# Altium PCB IOT_Speaker-PCB-v2.0.PcbDoc (part 3 of 3)
Units mil, origin at the board's own origin, x right, y up, seen from the top; angles counter-clockwise.
Board outline 2439.55 x 2668.91 mil, 2 copper layers (Top Layer, Bottom Layer), stack 61.811 mil thick; 126 components, 76 nets, 382 pads, 136 vias.
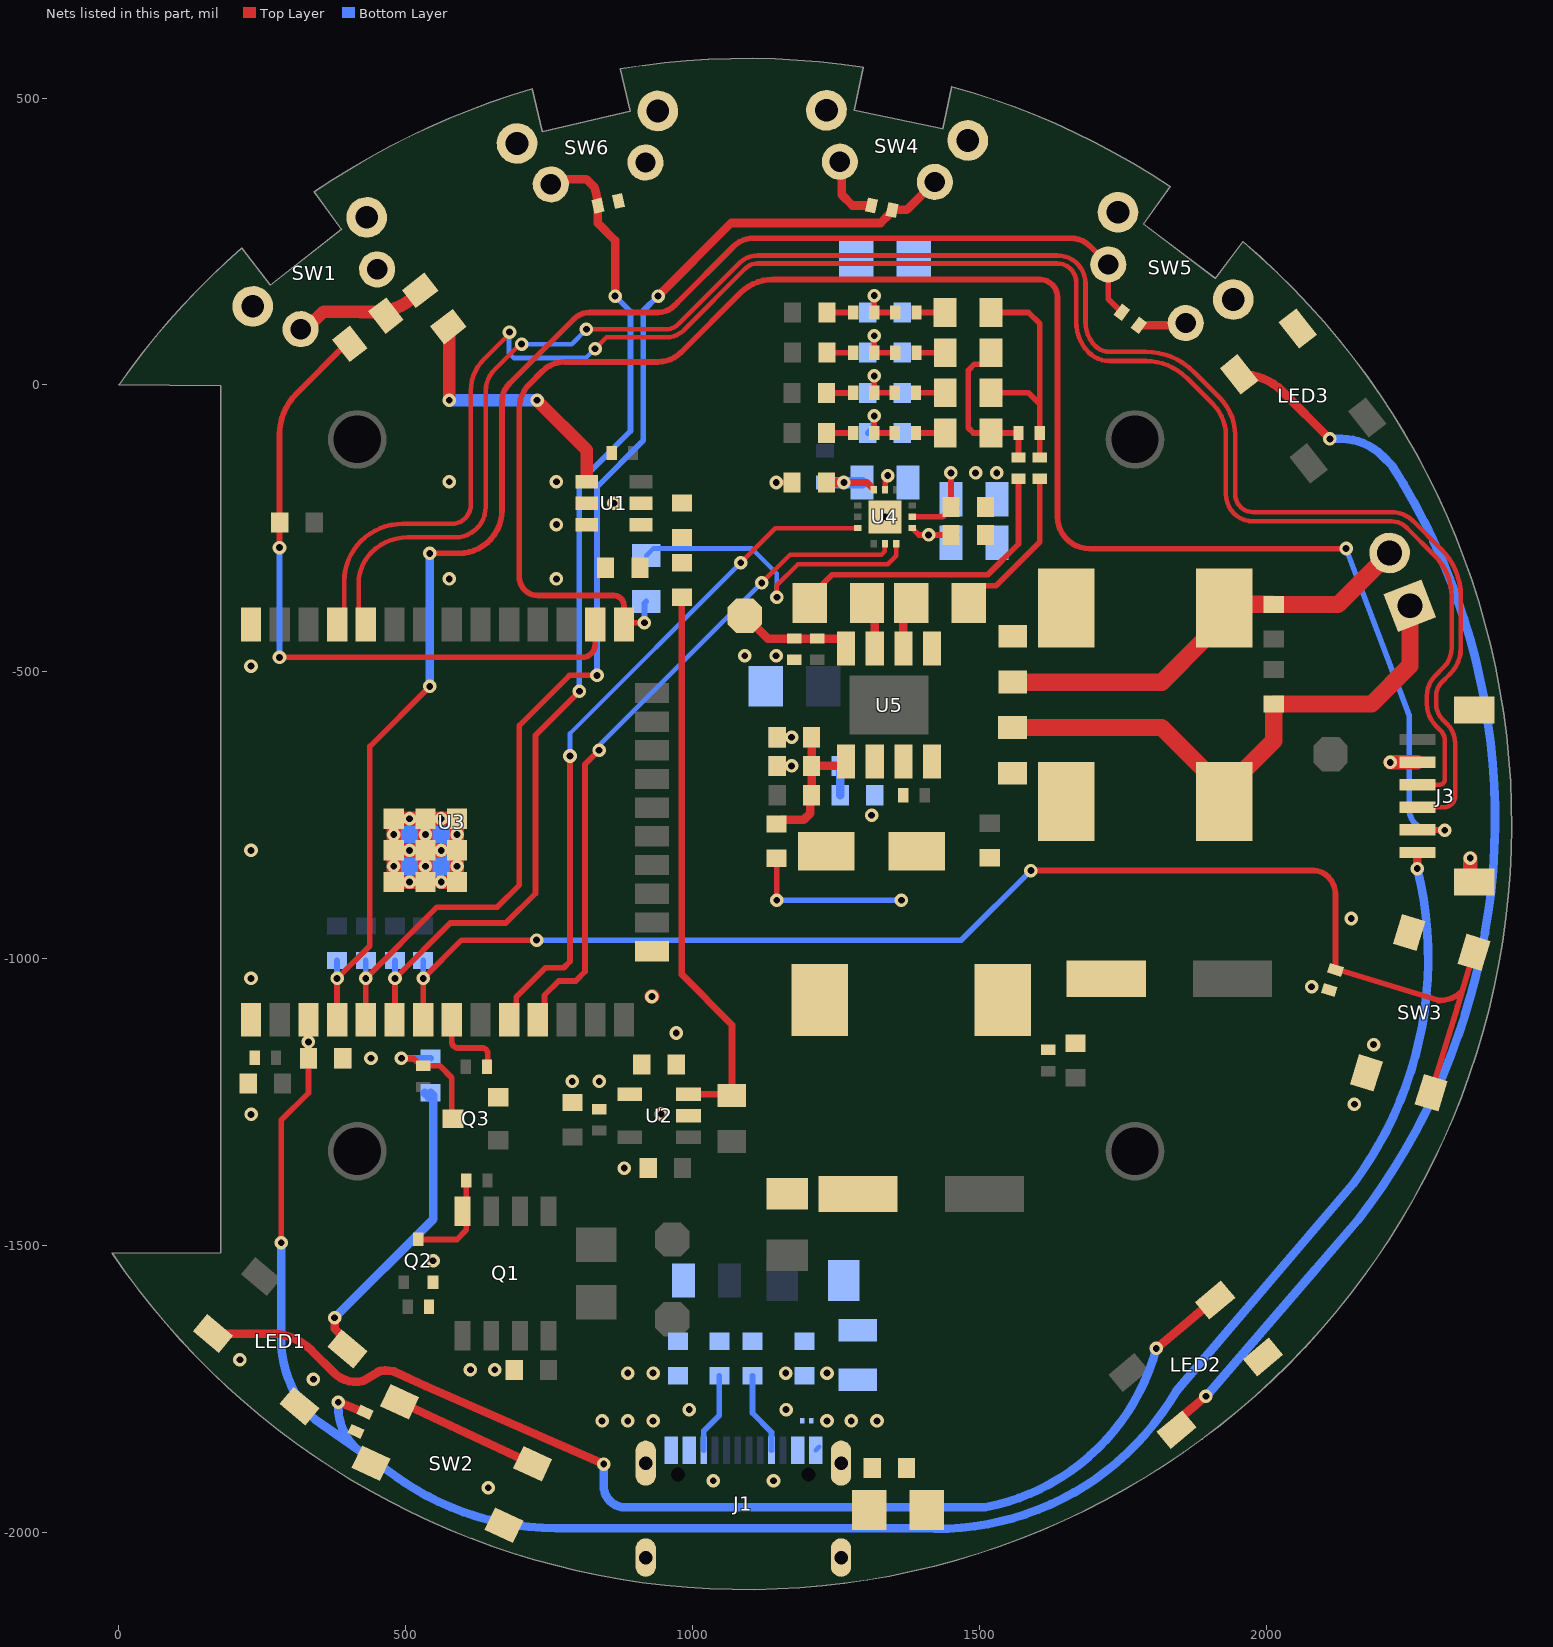
[diagram p2: the nets of this part, all layers, seen from the top]

## Via types
v1: diameter 23.62, hole 11.81, Top Layer to Bottom Layer, tented both sides, 136 vias

## Nets (pads, with @x,y where several pads share a name; then routed paths per layer and width w, separated by ;. In a path a pad name is that pad's centre, name@x,y a point inside that pad or via, vN(x,y) a via of type N, cw(c..) or ccw(c..) an arc to the next point about the centre after c; other vN are vias at no path point) (continued)
BUTTON_1: C14.2 R13.1 SW5.2 U3.4 | length 2565.9
  Top Layer w10: U3.4@380.34,-1106.53 v1(380.34,-1034.49) 437.43,-977.4 437.43,-629.91 v1(542,-525.34) ; v1(542,-293.5) 592.21,-293.5 ccw(c592.21,-217.8) 667.92,-217.8 667.92,-28.57 cw(c712.11,-28.57) 680.86,2.68 793.39,115.21 cw(c820.69,87.91) 820.69,126.51 939.75,126.51 ccw(c939.75,166.33) 967.91,138.18 ; C14.2@1748.2,126.51 1724.55,150.14 SW5.2@1724.55,210.09 1692.62,242.02 ccw(c1658.83,208.18) 1658.86,256 1658.79,256 1106.88,256 ccw(c1106.88,204.93) 1070.77,241.04 973.56,143.83 ; 967.91,138.18 973.56,143.83 ; 967.91,138.18 973.56,143.83
  Bottom Layer w10: v1(380.34,-1034.49) R13.1@380.34,-1002.99
  Bottom Layer w15: v1(542,-525.34) v1(542,-293.5)
BUTTON_2: C15.2 R14.1 SW4.1 U3.5 | length 2159.4
  Top Layer w10: U3.5@430.34,-1106.53 v1(430.34,-1034.49) 554.66,-910.17 659.34,-910.17 698.06,-871.45 698.06,-593.72 785.62,-506.16 v1(833.35,-506.16)
  Top Layer w15: v1@940,155.25 1067.04,282.29 1327.5,282.29 1343.78,298.57 1343.96,298.57 1347.86,302.47 C15.2@1347.86,305.17 1373.41,305.18 SW4.1@1422.2,353.97
  Bottom Layer w10: v1(430.34,-1034.49) R14.1@430.34,-1002.99 ; v1(833.35,-506.16) 833.35,-177.65 914.12,-96.88 914.12,129.37 v1(939.75,155)
BUTTON_3: C13.2 R15.1 SW6.2 U3.6 | length 1818.1
  Top Layer w10: U3.6@480.34,-1106.53 481.22,-1105.65 v1@481.22,-1036.33 ; v1(481.22,-1034.49) 577.72,-938 674.36,-938 726,-886.37 726,-610.62 v1(802.62,-534)
  Top Layer w15: SW6.2@752.82,349.68 762.01,358.86 814.75,358.86 829.64,343.97 835.27,317.57 C13.2@834.93,312.37 834.93,282.07 864.93,252.07 v1(864.93,155)
  Bottom Layer w10: v1(481.22,-1034.49) R15.1@481.22,-1002.99 ; v1(802.62,-534) 802.62,-169.38 891.7,-80.3 891.7,128.23 v1(864.93,155)
BUTTON_4: C16.2 R16.1 SW3.3 SW3.4 U3.7 | length 2416.3
  Top Layer w10: U3.7@530.34,-1106.53 v1(530.34,-1034.49) 597.16,-967.67 v1(728.06,-967.67) ; v1(1589.66,-846.46) 2082.7,-846.46 2082.76,-846.46 cw(c2082.81,-880.66) 2107.8,-857.31 2108.27,-857.82 cw(c2077.1,-888.28) 2120.68,-888.28 C16.2@2120.68,-1019.36 2128.23,-1020.32 2299.98,-1072.83 2302.47,-1072.83 ccw(c2302.47,-1017.72) 2341.44,-1056.69 ; SW3.4@2287.33,-1233.68 2293.93,-1212.11 2333.41,-1082.99 2341.44,-1056.69 ; SW3.3@2362.15,-988.96 2355.56,-1010.53 2341.46,-1056.63 2341.44,-1056.69
  Bottom Layer w10: v1(530.34,-1034.49) R16.1@530.35,-1002.99 ; v1(728.06,-967.67) 1468.45,-967.67 v1(1589.66,-846.46)
C_AGND: C23.1 C24.1 C25.1 C26.1 C27.1 C28.2 C29.1 C30.1 C31.2 C32.1 R46.2 U4.8 U4.13 | length 54.1
  Top Layer w10: v1(1145.82,-170) C23.1@1173.29,-170 ; U4.8@1335.36,-182.53 1335.88,-182.02 1335.88,-166.17 1340.36,-161.69 v1(1340.36,-158)
  other v1: 1335.36,-229.74 1493.36,-153.18 1530.36,-153.18
CLKIN: R21.2 U4.3 | length 563.4
  Top Layer w8: v1(1147,-370) 1147,-349.38 1183.64,-312.73 1339.95,-312.73 1355.05,-297.63 U4.3@1355.05,-276.94
  Bottom Layer w8: R21.2@919,-297.56 931.56,-285 1103.34,-285 1147,-328.66 v1(1147,-370)
CTRL: R40.2 R41.1 TP2.1 U5.8 | length 205.9
  Top Layer w15: TP2.1@1091,-402 1131,-442 R41.1@1177.43,-442 R40.2@1217,-442 1259.14,-442 1267.43,-450.29 U5.8@1267.43,-459.75
DATA_IN: U3.10 U4.12 | length 1211.8
  Top Layer w8: v1(1083.75,-310) 1144.33,-249.42 U4.12@1288.16,-249.42
  Top Layer w10: U3.10@680.34,-1106.53 692.71,-1094.17 692.71,-1066.72 743.47,-1015.96 775.31,-1015.96 786.34,-1004.93 v1(786.34,-646.71)
  Bottom Layer w8: v1(786.34,-646.71) 786.34,-607.41 v1(1083.75,-310)
DIN: Q3.2 R18.1 U3.8 | length 136.3
  Top Layer w10: U3.8@580.34,-1106.53 580.33,-1145.2 ccw(c590.64,-1145.2) 590.64,-1155.51 632.8,-1155.51 cw(c632.8,-1165.7) 642.99,-1165.7 642.99,-1186.78 cw(c641.56,-1186.78) R18.1@641.56,-1188.21
DIN#: LED1.4 R20.1 | length 539.9
  Top Layer w15: v1(376,-1626) 376,-1644.72 398.41,-1667.13 LED1.4@398.41,-1680.55
  Bottom Layer w15: v1(376,-1626) 547.84,-1454.16 547.84,-1241.06 547.84,-1238.06 545.59,-1235.81 R20.1@543.34,-1233.56 ; R20.1@532.84,-1233.56 R20.1@540.34,-1241.06
DOUT1: LED1.2 LED2.4 | length 2034.4
  Top Layer w15: LED1.2@164.11,-1653.54 265.05,-1653.54 cw(c265.05,-1753.54) 335.76,-1682.83 374.9,-1721.98 374.98,-1722.05 ccw(c412.12,-1684.9) 408.6,-1737.32 413.36,-1737.64 ccw(c415.32,-1708.45) 430.62,-1733.38 451.5,-1720.57 451.55,-1720.54 cw(c459.35,-1733.35) 456.89,-1718.56 cw(c465.94,-1773.61) 478.12,-1719.17 cw(c474.81,-1733.8) 481.03,-1720.15 481.09,-1720.18 535.36,-1745.23 535.49,-1745.29 v1(845,-1881) ; v1(1808.37,-1679.45) 1893.26,-1608.22 LED2.4@1910.93,-1595
  Bottom Layer w15: v1(845,-1881) 845,-1918.73 ccw(c882.63,-1918.73) 882.63,-1956.36 1510,-1956.36 ccw(c1438.1,-1579.69) v1(1808.37,-1679.45)
DOUT2: LED2.2 LED3.4 | length 2233.6
  Top Layer w15: LED2.2@1843.64,-1821.06 1852.99,-1797.93 v1(1894.86,-1762.8) ; LED3.4@1964.67,18.52 LED3.4@1952.49,18.52 1957.06,18.52 cw(c1957.06,-81.48) 2027.77,-10.77 ; 2021.28,-4.28 2027.77,-10.77 ; v1(2111,-94) 2027.77,-10.77
  Bottom Layer w15: v1@1895,-1763 2084.92,-1542.51 2087.47,-1539.55 2158.65,-1456.91 ccw(c1254.73,-755.57) 2219.78,-141.04 2202.02,-123.29 ccw(c2131.31,-194) 2131.31,-94 v1(2111,-94) ; 2087.76,-1539.8 2087.92,-1539.62
ENA: C11.2 C12.2 J3.6 R12.1 SW2.3 SW2.4 U3.3 | length 3850.3
  Top Layer w10: v1(282.78,-1495) 282.78,-1281.62 330.34,-1234.06 C12.2@330.35,-1173.54 330.34,-1167.55 U3.3@330.34,-1106.53
  Top Layer w15: v1(382.21,-1773.16) 423.87,-1789.72 C11.2@429.04,-1790.48 ; SW2.4@489.27,-1772.44 SW2.3@721.2,-1880.59 ; v1(2263.28,-843.05) J3.6@2263.28,-814.9
  Top Layer w30: SW2.4@488.16,-1771.34 SW2.4@489.27,-1772.44
  Bottom Layer w15: v1(282.78,-1495) 282.78,-1663.1 282.78,-1663.16 ccw(c478.08,-1663.16) 340.88,-1802.14 ccw(c351.36,-1791.42) 342.68,-1803.65 342.72,-1803.68 376.17,-1827.26 401.65,-1845.22 413.7,-1853.72 ; v1(382.21,-1773.16) 382.21,-1780.81 ccw(c482.21,-1780.81) 411.5,-1851.52 413.7,-1853.72 ; v1(2263.28,-843.05) cw(c1626.42,-999.52) 2150.86,-1393.27 1842.73,-1754.57 cw(c1426.18,-1511.46) 1399.59,-1993.03 1394.01,-1992.72 761.42,-1992.72 761.36,-1992.72 cw(c761.16,-1518.13) 495.9,-1911.67 487.76,-1905.93 479.62,-1900.19 421.63,-1859.31 413.7,-1853.72
  other v1: 330.34,-1145.05
ENABLE: R7.2 R11.1 U2.3 | length 980.7
  Top Layer w12: R7.2@981.16,-370 981.16,-1027.96 1068.45,-1115.25 R11.1@1068.45,-1236.38 ; U2.3@992.7,-1236.38 R11.1@1068.45,-1236.38 ; R11.1@1068.45,-1238.78 R11.1@1068.45,-1236.38
GND: C1.1 C2.1 C3.2 C4.2 C5.1 C6.1 C7.1 C8.1 C9.1 C10.1 C11.1 C12.1 C13.1 C14.1 C15.1 C16.1 C17.1 C18.1 D1.2 J1.A1/B12 J1.B1/A12 J3.2 J3.MP1 J3.MP2 LED1.3 LED2.3 LED3.3 Q2.2 R1.1 R3.2 R4.2 R9.1 R41.2 R45.1 R46.1 SW1.1 SW1.SH1 SW1.SH2 SW2.1 SW2.2 SW3.1 SW3.2 SW4.2 SW4.SH1 SW4.SH2 SW5.1 SW5.SH1 SW5.SH2 SW6.1 SW6.SH1 SW6.SH2 U1.2 U1.3 U2.2 U3.1 U3.15 U3.38 U3.39 U3.39_16 U3.40 U3.41 U3.42 U3.43 U3.44 U3.45 U3.46 U3.47 | length 1349.4
  Top Layer w15: SW4.2@1256.61,389.16 1259.93,385.85 1259.93,331.52 1278.58,312.87 C15.1@1311.67,312.86 ; C14.1@1777.71,104.19 1855.8,104.19 SW5.1@1859.58,107.97
  Top Layer w25: U3.39_16@561.84,-866.38 U3.45@589.4,-866.38 U3.47@589.4,-756.14 U3.44@534.28,-756.14 ; U3.39_16@561.84,-811.26 U3.43@534.28,-811.26 ; v1(929,-1066) v1@929.55,-1065.45 ; v1@2216.6,-657.4 J3.2@2263.29,-657.4 ; v1(2355.56,-824.72) 2355.56,-858.92 J3.MP2@2362.7,-866.06 ; U3.40@479.16,-811.26 U3.43@534.28,-811.26 ; U3.40@479.16,-811.26 U3.41@479.16,-756.14 U3.44@534.28,-756.14 ; U3.40@479.16,-811.26 U3.39@479.16,-866.38 U3.42@534.28,-866.38 U3.43@534.28,-811.26 ; U3.43@534.28,-811.26 U3.44@534.28,-756.14
  Bottom Layer w8: J1.A1/B12@1214.48,-1856.92 J1.A1/B12@1220.48,-1850.92
  Bottom Layer w25: U3.39_16@479.16,-838.82 506.72,-838.82 ; U3.39_16@479.16,-783.7 506.72,-783.7 ; U3.39_16@506.72,-866.38 506.72,-838.82 ; U3.39_16@506.72,-756.14 506.72,-783.7 ; U3.39_16@561.84,-866.38 561.84,-838.82 561.84,-783.7 ; U3.39_16@561.84,-756.14 561.84,-783.7 ; U3.39_16@589.4,-838.82 506.72,-838.82 ; U3.39_16@589.4,-783.7 561.84,-783.7 ; 506.72,-838.82 506.72,-783.7 ; 506.72,-783.7 561.84,-783.7
  other v1: 643.85,-1922.33 842.13,-1805.66 887.1,-1805.66 931.21,-1805.66 1234.23,-1805.66 1276.49,-1805.66 1321.46,-1805.66 339,-1733 612.8,-1716.73 655.02,-1716.73 211,-1699 547.59,-1526.73 881,-1365 230.34,-1271.55 945.52,-1270.78 2153.68,-1253.71 790.34,-1214 837.34,-1214 439.42,-1173.56 2187.03,-1149.84 971.52,-1129.52 2078.86,-1048.79 230.28,-1034.49 2148,-930 230.28,-811.26 2216,-658 230.28,-490 1091,-472 1145.43,-472 575.64,-338 762.62,-338 762.62,-243.39 862.76,-206 575.64,-168.6 762.62,-168.6
IO0: J3.5 R21.1 U3.25 | length 3187.9
  Top Layer w10: v1(916.08,-414.64) 883.26,-414.64 U3.25@880.34,-417.56 880.34,-384.61 ccw(c862.74,-384.61) 862.74,-367 730.34,-367 cw(c730.34,-334.72) 698.06,-334.72 698.06,-40.15 cw(c756.35,-40.15) 715.13,1.07 738.04,23.98 cw(c777.36,-15.33) 777.36,40.27 939.75,40.27 ccw(c939.75,96.76) 979.7,56.81 1083.57,160.69 cw(c1139.85,104.41) 1139.85,184 1605,184 cw(c1605,153.12) 1635.88,153.12 1635.88,-229.16 ccw(c1691.96,-229.16) 1691.96,-285.23 2139,-285.23 v1(2139,-285) ; J3.5@2263.29,-775.51 2263.53,-775.76 2310.76,-775.76 v1(2311,-776)
  Bottom Layer w10: v1(916.08,-414.64) 916.08,-380.48 R21.1@919,-377.56 ; v1(2139,-285) 2249,-576 2249,-738.88 ccw(c2286.12,-738.88) 2286.12,-776 v1(2311,-776)
LRCLK: U3.11 U4.2 | length 1191.1
  Top Layer w8: v1(1120.62,-345) 1169.74,-295.88 1329.26,-295.88 1335.26,-289.88 1335.26,-277.05 U4.2@1335.36,-276.94
  Top Layer w10: U3.11@730.34,-1106.53 741.92,-1094.96 741.92,-1063.56 766.62,-1038.86 796.37,-1038.86 812.62,-1022.6 812.62,-661.22 v1(837,-636.85)
  Bottom Layer w8: v1(837,-636.85) 839.99,-633.86 839.99,-625.63 v1(1120.62,-345)
NetC2_2: C2.2 J1.S1 J1.S2 J1.S3 J1.S4 R1.2
NetC7_2: C7.2 U2.4
NetC19_2: C19.2 R22.1 | length 46.4
  Top Layer w10: C19.2@1234.36,126.33 R22.1@1280.81,126.33
NetC20_2: C20.2 R23.1 | length 46.4
  Top Layer w10: C20.2@1234.36,56.33 R23.1@1280.81,56.33
NetC21_2: C21.2 R24.1 | length 46.5
  Top Layer w10: C21.2@1233.29,-13.76 R24.1@1279.81,-13.76
NetC22_2: C22.2 R25.1 | length 46.5
  Top Layer w10: C22.2@1233.29,-83.57 R25.1@1279.81,-83.57
NetC23_2: C23.2 C25.2 FB2.1 U4.9 | length 151.6
  Top Layer w10: U4.9@1315.68,-182.53 U4.9@1315.68,-181.49
  Top Layer w12: v1@1265.09,-170 1304.19,-170 U4.9@1315.68,-181.49
  Top Layer w15: C23.2@1233.29,-170 v1(1263.74,-170)
  Bottom Layer w20: FB2.1@1230.56,-170 C25.2@1295.36,-170
NetC24_2: C24.2 C26.2 U4.4 | length 83.4
  Top Layer w10: U4.4@1382.57,-249.42 1383.61,-249.42 1384.12,-249.94 1384.12,-250.98 1394.56,-261.41 C24.2@1460.36,-261.41
  other v1: 1411.43,-261.41
NetC27_2: C27.2 C30.2 U4.5 | length 144.5
  Top Layer w10: U4.5@1382.57,-229.74 1436.11,-229.74 1452.86,-212.99 C27.2@1460.36,-212.99 ; C27.2@1450.36,-212.99 v1(1450.36,-153.18)
NetC28_1: C28.1 R22.2 R36.1 | length 65.1
  Top Layer w10: R22.2@1316.81,126.33 v1(1316.81,155.9) ; R22.2@1317.81,126.33 R36.1@1353.36,126.33
NetC29_2: C29.2 R25.2 R39.1 | length 99.4
  Top Layer w10: v1(1316.81,-54) R25.2@1316.81,-83.57 R39.1@1352.36,-83.57
  Bottom Layer w10: C29.2@1305.36,-83.57 1315.36,-73.57 1315.36,-55.44 v1(1316.81,-54)
NetC31_1: C31.1 R23.2 R37.1 | length 65.1
  Top Layer w10: R23.2@1316.81,56.33 v1(1316.81,85.9) ; R23.2@1317.81,56.33 R37.1@1353.36,56.33
NetC32_2: C32.2 R24.2 R38.1 | length 65.3
  Top Layer w10: v1(1316.81,15.9) R24.2@1316.81,-13.76 1316.86,-13.72 1352.32,-13.72 R38.1@1352.36,-13.67
NetC33_1: C33.1 R31.1 | length 275.9
  Top Layer w10: R31.1@1481.43,-375 1506.43,-350 1528.77,-350 1605,-273.77 C33.1@1605,-163.41
NetC33_2: C33.2 R26.2 R28.2 R30.2 | length 418.8
  Top Layer w10: R26.2@1520.26,126.33 1585.65,126.33 1605,106.98 R30.2@1605,-83.57 C33.2@1605,-126.41 ; R28.2@1520.36,-13.67 1585.65,-13.67 1605,-33.02
NetC34_1: C34.1 R32.1 | length 521.3
  Top Layer w10: R32.1@1204,-375 1204,-370 1243.24,-330.76 1514.51,-330.76 1568,-277.27 C34.1@1568,-163.41
NetC34_2: C34.2 R27.2 R29.2 R30.1 | length 289.9
  Top Layer w10: R27.2@1520.36,56.33 1520.36,51.33 1505.36,36.33 1491.22,36.33 1480.36,25.48 1480.36,-74.52 1489.41,-83.57 R30.1@1568,-83.57 C34.2@1568,-126.41
NetC35_1: C35.1 C36.2 C37.2 FB3.1 L1.1
NetC38_2: C38.2 R33.1 | length 51
  Bottom Layer w15: R33.1@1257.43,-715.08 C38.2@1257.43,-664.08
NetC39_2: C39.2 R34.1 R35.2 R42.2 U5.1 | length 262.7
  Top Layer w15: R34.1@1146.53,-765 1153.67,-757.86 1193.74,-757.86 1205.29,-746.31 1205.29,-717.22 C39.2@1207.43,-715.08 R35.2@1207.43,-664.08 R42.2@1207.43,-614.08 ; R35.2@1207.43,-663.9 1259.93,-663.9 U5.1@1267.43,-656.4
NetC40_2: C40.2 C41.2 C42.1 D2.1 R34.2 U5.3 | length 297
  Top Layer w10: v1@1146.53,-904.57 R34.2@1146.53,-825
  Bottom Layer w10: v1(1146.53,-898) v1(1364,-898)
NetC43_2: C43.2 J9.2 L2.2 R47.2 | length 761.8
  Top Layer w30: R47.2@1558,-518 1817.68,-518 1892.98,-442.7 1892.98,-422.82 1933.43,-382.37 2010.16,-382.37 2010.5,-382.7 C43.2@2012.66,-382.7 ; C43.2@2013,-382.7 2125.18,-382.7 J9.2@2215,-292.88
NetC44_1: C44.1 J9.1 L3.2 R48.2 | length 1009.1
  Top Layer w30: R48.2@1557.61,-596.81 1817.29,-596.81 1892.58,-672.1 1892.58,-691.98 L3.2@1926.4,-725.81 ; L3.2@1926.8,-726 1926.8,-706.31 2013,-620.11 C44.1@2013,-556 2183.62,-556 2250.27,-489.35 J9.1@2250.27,-384.76
NetD2_2: D2.2 L1.2 R33.2 U5.2
  other v1: 1312,-750
NetF1_2: F1.2 FB1.1
NetJ1_A5: J1.A5 R3.1 | length 143.8
  Bottom Layer w10: R3.1@1104.25,-1726.99 1104.25,-1792.12 1137.71,-1825.58 J1.A5@1137.71,-1856.92
NetJ1_B5: J1.B5 R4.1 | length 141.1
  Bottom Layer w10: J1.B5@1019.6,-1856.92 1019.6,-1823.08 1046.66,-1796.03 R4.1@1046.66,-1726.99
NetQ1_4: Q1.4 Q2.3 R8.1 | length 176.5
  Top Layer w10: Q2.3@522,-1489.33 589.12,-1489.33 605.5,-1472.96 R8.1@605.5,-1386.73
NetQ3_3: Q3.3 R19.1 R20.2 | length 222
  Top Layer w10: v1(492.54,-1173.56) 513.61,-1173.56 526.83,-1186.78 559.49,-1186.78 580.33,-1207.63 Q3.3@580.33,-1276.91
  Bottom Layer w12: v1(492.54,-1173.56) R20.2@543.34,-1173.56
NetR2_2: R2.2 R49.1 SW1.2 | length 269.3
  Top Layer w22: SW1.2@316.75,97.31 SW1.2@321.24,97.31 ; SW1.2@327.5,97.31 SW1.2@321.24,97.31 ; R2.2@449.63,126.46 442.84,126.65 421.08,127.23 ; R2.2@465.34,120.97 R2.2@467.51,120.97 ; R49.1@525.15,164.81 516.87,156.52 cw(c446.16,227.23) 446.16,127.23 421.08,127.23 ; SW1.2@321.24,97.31 326.47,97.31 356.98,127.82 399.33,127.82 421.08,127.23
NetR5_1: R5.1 U1.4
NetR5_2: R5.2 R6.2 R7.1
NetR6_1: R6.1 U1.5
NetR26_1: R26.1 R36.2 | length 50
  Top Layer w10: R36.2@1390.36,126.33 R26.1@1440.36,126.33
NetR27_1: R27.1 R37.2 | length 50
  Top Layer w10: R37.2@1390.36,56.33 R27.1@1440.36,56.33
NetR28_1: R28.1 R38.2 | length 51
  Top Layer w10: R38.2@1389.36,-13.67 R28.1@1440.36,-13.67
NetR29_1: R29.1 R39.2 | length 51
  Top Layer w10: R39.2@1389.36,-83.57 R29.1@1440.36,-83.57
NetR35_1: R35.1 R44.2 | length 52.4
  Top Layer w15: R35.1@1147.43,-664.08 v1@1174.62,-664.08
  Bottom Layer w15: R44.2@1147.43,-664.08 v1(1172.62,-664.08)
NetR42_1: R42.1 R43.2 | length 52.4
  Top Layer w15: R42.1@1147.43,-614.08 v1@1174.62,-614.08
  Bottom Layer w15: R43.2@1147.43,-614.08 v1(1172.62,-614.08)
NetR49_2: R49.2 U1.1 | length 459.9
  Top Layer w22: R49.2@574.41,101.76 cw(c571.42,98.78) 575.64,98.78 v1(575.64,-26.69) ; v1(729,-26.69) 815.51,-113.2 U1.1@815.51,-168.58
  Bottom Layer w22: v1(575.64,-26.69) v1(729,-26.69)
PA_IN+: R31.2 U5.6 | length 90.5
  Top Layer w15: U5.6@1367.43,-459.75 1367.43,-389 R31.2@1381.43,-375
PA_IN-: R32.2 U5.7 | length 90.3
  Top Layer w15: R32.2@1304,-375 1317.43,-388.43 U5.7@1317.43,-459.75
PA_OUTL+: L2.1 R47.1 U5.5
PA_OUTL-: L3.1 R48.1 U5.4
PWR_SW: R2.1 R17.1 U3.26 | length 1198.8
  Top Layer w10: v1(279.95,-283.46) 279.95,-239.97 279.95,-86.18 cw(c379.95,-86.18) 309.24,-15.47 396.43,71.72 R2.1@402.3,71.72 ; v1@280.03,-474.81 807.19,-474.81 ; 811.19,-474.81 807.19,-474.81 ; U3.26@830.34,-417.56 830.34,-451.66 cw(c807.19,-451.66) 807.19,-474.81
  Top Layer w22: R17.1@279.95,-239.97 R17.1@280.34,-239.97
  Bottom Layer w10: v1(279.95,-474.81) v1(279.95,-283.46)
  Bottom Layer w22: v1@279.53,-283.46 v1(279.95,-283.46)
RXD: J3.4 U3.34 | length 3231.6
  Top Layer w8: U3.34@430.34,-417.56 417.92,-405.14 417.92,-345.7 417.92,-345.64 cw(c494.28,-345.64) 440.29,-291.65 cw(c502.89,-354.25) 502.89,-265.72 586.14,-265.72 ccw(c586.14,-212.47) 639.39,-212.47 639.39,-10.69 cw(c692.69,-10.69) 655,27 697.44,69.44 cw(c701.81,65.07) v1(701.81,71.25) ; v1(815,97) 954,97 ccw(c954,126.46) 974.83,105.63 1082.1,212.9 cw(c1113.14,181.86) 1113.14,225.76 1635.88,225.76 cw(c1635.88,176.79) 1684.85,176.79 1684.85,109.41 ccw(c1743.41,109.41) 1702,68 ccw(c1726.42,92.42) 1726.42,57.89 1790.32,57.89 cw(c1790.32,-58.21) 1872.41,23.88 1918.71,-22.41 cw(c1853.59,-87.52) 1945.68,-87.52 1945.68,-189.81 ccw(c1978.05,-189.81) 1955.16,-212.71 ccw(c1976.41,-191.46) 1976.41,-221.51 2218.16,-221.51 cw(c2218.16,-274.91) 2255.92,-237.15 2305.09,-286.33 cw(c2223,-368.42) 2339.1,-368.42 2339.1,-458.12 cw(c2274.45,-458.12) 2320.16,-503.84 2305.94,-518.06 ccw(c2329.82,-541.94) 2296.05,-541.94 2296.05,-555.93 ccw(c2333.56,-555.93) 2307.04,-582.45 2314.89,-590.3 cw(c2280.53,-624.65) 2329.12,-624.65 2329.12,-716.46 cw(c2309.43,-716.46) 2309.43,-736.14 J3.4@2263.29,-736.14
  Bottom Layer w8: v1(701.81,71.25) 789.25,71.25 v1(815,97)
TXD: J3.3 U3.35 | length 3242.4
  Top Layer w8: U3.35@380.34,-417.56 392.79,-405.11 392.79,-342.17 392.79,-342.11 cw(c491.44,-342.11) 421.68,-272.36 cw(c494.89,-345.57) 494.89,-242.03 580.34,-242.03 ccw(c580.34,-208.98) 613.39,-208.98 613.39,-10.69 cw(c692.69,-10.69) 636.62,45.38 679.05,87.82 ccw(c674.68,92.19) v1(680.86,92.19) ; v1(830,63.08) 849.92,83 954,83 ccw(c954,126.46) 984.73,95.73 1092,203 cw(c1113.14,181.86) 1113.14,211.76 1635.88,211.76 cw(c1635.88,178.89) 1668.75,178.89 1668.75,109.41 ccw(c1743.41,109.41) 1690.62,56.62 ccw(c1726.42,92.42) 1726.42,41.79 1790.32,41.79 cw(c1790.32,-58.21) 1861.03,12.5 1907.32,-33.79 cw(c1853.59,-87.52) 1929.58,-87.52 1929.58,-189.81 ccw(c1978.05,-189.81) 1943.78,-224.09 ccw(c1976.41,-191.46) 1976.41,-237.61 2218.2,-237.61 cw(c2218.27,-274.63) 2244.44,-248.44 2244.5,-248.5 2293.71,-297.71 cw(c2223,-368.42) 2323,-368.42 2323,-458.12 cw(c2274.45,-458.12) 2308.78,-492.45 2294.56,-506.67 ccw(c2329.82,-541.94) 2279.95,-541.94 2279.95,-555.93 ccw(c2333.56,-555.93) 2295.65,-593.83 2303.5,-601.68 cw(c2284.55,-620.63) 2311.35,-620.63 2311.35,-687.34 cw(c2301.92,-687.34) 2301.92,-696.77 J3.3@2263.29,-696.77
  Bottom Layer w8: v1(680.86,92.19) 680,91.33 680,55 688,47 813.92,47 v1(830,63.08)
VUSB: C3.1 C4.1 D1.1 F1.1 J1.A4/B9 J1.B4/A9
  other v1: 1036,-1910 1141,-1910 994,-1786 1162.98,-1786 887.1,-1722.27 931.21,-1722.27 1162.3,-1722.27 1234.23,-1722.27
pads on no net: J1.A6 J1.A7 J1.A8 J1.B6 J1.B7 J1.B8 J1.MH LED3.2 U3.13 U3.14 U3.16 U3.17 U3.18 U3.19 U3.20 U3.21 U3.22 U3.23 U3.24 U3.27 U3.28 U3.29 U3.30 U3.31 U3.32 U3.33 U3.37

## Polygon pours and split planes (outlines as drawn)
AGND on Top Layer "AGND_L01_P021" (solid, remove dead copper, pour order 21): 1129.03,-590.58 1229,-590.58 1229,-506.64 1854.49,-506.64 1933.43,-427.7 2030.5,-427.7 2030.5,-1377.5 1904,-1504 1371,-1504 1371,-780.29 1371.76,-779.54 1129.49,-779.54 1129.03,-780
C_AGND on Top Layer "C_AGND_L01_P020" (solid, pour order 20): 1125.24,-118.68 1125.24,-289.88 1549,-289.88 1549,-118.68
PA_OUTL+ on Top Layer "PA_OUTL+_L01_P019" (solid, pour order 19): 1401.64,-489.38 1401.64,-430.12 1521.83,-430.12 1601.99,-349.96 1601.99,-321.25 1700.42,-321.25 1700.42,-473.17 1449.42,-473.17 1433.22,-489.38
PA_OUTL- on Top Layer "PA_OUTL-_L01_P018" (solid, pour order 18): 1401.64,-626.78 1401.64,-686.03 1521.83,-686.03 1601.99,-766.19 1601.99,-794.9 1700.42,-794.9 1700.42,-642.98 1449.42,-642.98 1433.22,-626.78
NetC40_2 on Top Layer "NETC40_2_L01_P017" (solid, pour order 17): 1409.65,-779.54 1439.95,-779.54 1439.95,-808.16 1439.11,-809 1544,-809 1544,-874 1695,-874 1789.9,-968.9 1789.9,-1066.5 1652.1,-1066.5 1652.1,-1003.5 1605.86,-957.26 1333.22,-957.26 1333.22,-787.84 1351.64,-769.42 1351.64,-626.78 1383.22,-626.78 1383.22,-753.1
NetD2_2 on Top Layer "NETD2_2_L01_P016" (solid, pour order 16): 1333.22,-626.78 1333.22,-749.7 1301.99,-780.93 1301.99,-977.78 1301.99,-1134.99 1184.05,-1134.99 1184.05,-779.54 1226.53,-779.54 1301.64,-704.43 1301.64,-626.78
NetC35_1 on Top Layer "NETC35_1_L01_P012" (solid, pour order 12): 1684.85,-1177.5 1684.95,-1177.4 1684.95,-1132.5 1603.73,-1132.5 1589.66,-1118.44 1589.66,-1009.01 1348.99,-1009.01 1325,-1033 1325,-1233 1192,-1366 1129.17,-1366 1129.17,-1450 1356.9,-1450 1356.9,-1366 1545.4,-1177.5 1684.95,-1177.5
GND on Top Layer "NONET_L-01_P-001" (solid, remove dead copper, pour order 25): -11.73,-1513.44 177.13,-1512.97 177.13,-1.08 0,-0.02 cw(c1092.1,-764.27) 213.9,238.49 264.02,174.35 388.11,271.32 340.48,336.6 cw(c1092.88,-764.33) 720.48,516.09 737.6,441.8 891.07,477.23 874.02,551.09 cw(c1093.4,-764.02) 1297.6,553.53 1281.77,479.08 1435.83,446.32 1451.54,520.26 cw(c1093.74,-764.46) 1832.72,345.69 1785.99,280.46 1911.11,185.85 1959.53,249.91 cw(c1093.33,-765.28) 1264.47,-2088.77 cw(c1093.33,-765.28) 912.5,-2087.48 cw(c1093.33,-765.28)
AGND on Bottom Layer "AGND_L02_P014" (solid, pour order 14): 1651.5,-1489 1651.5,-1360.5 1895,-1117 1958,-1117 1958,-460 1191,-460 1191,-697.58 1132.43,-697.58 1132.43,-763.29 1706,-763.29 1706,-927 1473,-1160 1473,-1489
AGND on Bottom Layer "AGND_L02_P026" (solid, pour order 26): 1132.43,-763.29 1132.43,-697.58 1191,-697.58 1191,-460 1538,-460 1538,-763.29
C_AGND on Bottom Layer "C_AGND_L02_P011" (solid, pour order 11): 1340.36,-219.35 1232.59,-219.35 1198,-184.76 1198,-142.44 1109.69,-142.44 1109.69,-202.69 1289,-382 1550,-382 1550,252 1548,254 1355.36,254 1340.36,239 1340.36,-200
GND on Bottom Layer "NONET_L-01_P-001" (solid, remove dead copper, pour order 24): -11.73,-1513.44 177.13,-1512.97 177.13,-1.08 0,-0.02 cw(c1092.1,-764.27) 213.9,238.49 264.02,174.35 388.11,271.32 340.48,336.6 cw(c1092.88,-764.33) 720.48,516.09 737.6,441.8 891.07,477.23 874.02,551.09 cw(c1093.4,-764.02) 1297.6,553.53 1281.77,479.08 1435.83,446.32 1451.54,520.26 cw(c1093.74,-764.46) 1832.72,345.69 1785.99,280.46 1911.11,185.85 1959.53,249.91 cw(c1093.33,-765.28) 1264.47,-2088.77 cw(c1093.33,-765.28) 912.5,-2087.48 cw(c1093.33,-765.28)
VUSB on Bottom Layer "NONET_L-01_P-001" (solid, pour order 23): 845,-1696.99 845,-1785 957.52,-1785 982.2,-1809.68 982.2,-1908.21 1005.01,-1931.03 1177.32,-1931.03 1194.8,-1913.54 1194.8,-1796.2 1206,-1785 1354,-1785 1354,-1696.99 1142,-1696.99 1142,-1833.3 1016.04,-1833.3 1016.04,-1696.99

## Other copper
Top Layer:
  region net NetR5_2: 943.85,-250.6 943.85,-336.1 978.85,-336.1 978.85,-250.6
  region net ENA: 492.19,-1831.41 502.53,-1809.23 423.65,-1772.45 413.31,-1794.63
  rectangle net DIN: 630.83,-1257.8 659.22,-1175.71
  rectangle net DIN: 631.83,-1257.8 690.43,-1220.71
  rectangle net NetC35_1: 1129.17,-1450 1356.9,-1366
  rectangle net 5V0: 1129.17,-1682.6 1218,-1489.53
  rectangle net 5V0: 734.02,-1734.23 810.54,-1568.74
  rectangle net 5V0: 585.24,-1682.6 1200.83,-1568.74
  rectangle net 5V: 635.24,-1493.95 699.02,-1374.23
  rectangle net 5V: 635.24,-1528.74 1093.45,-1414.88
  region net NetR5_1: 929.69,-231.57 857.85,-231.57 857.85,-292.49 929.69,-292.49
  region net NetR5_1: 878.35,-265.58 833.35,-265.58 833.35,-336.08 878.35,-336.08
  rectangle net VUSB: 974.72,-1813 1202.28,-1697.2
  rectangle net VUSB: 1018,-1931 1166,-1772
  rectangle net ENA: 315.34,-1191.05 345.34,-1077.01
  rectangle net 3.3V: 262.62,-902 397,-864.51
  rectangle net NetR5_2: 893.35,-336.1 998.85,-301.1
  rectangle net 5V: 887.13,-180.41 929.69,-106.15
  rectangle net NetC7_2: 868.69,-1248.19 926.52,-1166.79
  rectangle net 5V: 970,-1493.95 1093.45,-1299.37
  rectangle net 3.3V: 643.12,-1332.58 926.52,-1283.28
  region net NetC2_2: 900.51,-2029.2 900.51,-2072.2 1276.49,-2072.2 1276.49,-2029.2
  rectangle net NetC2_2: 897.45,-2071 940.45,-1845
  rectangle net NetC2_2: 1238,-2059.68 1343,-1845.18
  region net GND: 2121.87,-1077.92 2130.86,-1048.52 2066.99,-1028.99 2058,-1058.39
  region net NetR5_2: 998.85,-250.6 943.85,-250.6 943.85,-325 998.85,-325
  region net NetR6_1: 998.85,-190.6 890.32,-190.6 890.32,-220.6 998.85,-220.6
  region net ENA: 442.23,-1808.11 492.19,-1831.41 523.4,-1764.47 473.44,-1741.18
  rectangle net 3.3V: 262.62,-1235.05 300.28,-864.51
  rectangle net VUSB: 845.41,-1764 1258.77,-1697.2
  pour cut-out: 293.51,-1335.49 ccw(c415.56,-1335.49) 415.56,-1457.54 ccw(c415.56,-1335.49) 537.61,-1335.49 ccw(c415.56,-1335.49) 415.56,-1213.44 ccw(c415.56,-1335.49)
  pour cut-out: 293.47,-94.82 ccw(c415.51,-94.82) 415.51,-216.87 ccw(c415.51,-94.82) 537.56,-94.82 ccw(c415.51,-94.82) 415.51,27.23 ccw(c415.51,-94.82)
  pour cut-out: 1649.1,-94.82 ccw(c1771.15,-94.82) 1771.15,-216.87 ccw(c1771.15,-94.82) 1893.2,-94.82 ccw(c1771.15,-94.82) 1771.15,27.23 ccw(c1771.15,-94.82)
  pour cut-out: 1649.1,-1335.49 ccw(c1771.15,-1335.49) 1771.15,-1457.54 ccw(c1771.15,-1335.49) 1893.2,-1335.49 ccw(c1771.15,-1335.49) 1771.15,-1213.44 ccw(c1771.15,-1335.49)
  pour cut-out: 699.02,-1528.74 699.02,-1567.89 628.98,-1567.89 628.98,-1528.74
  pour cut-out: 461.64,-1142.06 461.64,-1218.9 493.51,-1218.9 493.51,-1142.06
  pour cut-out: 1093.45,-1450 1093.45,-1489.53 1219.1,-1489.53 1219.1,-1450
  pour cut-out: 2058,-633.87 2058,-1111.87 2030.41,-1111.87 2030.41,-633.87
  pour cut-out: 1229,-506.64 1228.43,-506.64 1228.43,-591.27 1192.43,-591.27 1192.43,-456.83 1229,-456.83
  pour cut-out: 1096.71,160.69 1096.71,-118.07 1329.76,-118.07 1329.76,160.69
  pour cut-out: 1974.3,-1096.67 1974.3,-1149.84 2030.41,-1149.84 2030.41,-1096.67
  pour cut-out: 1644.34,-1132.5 1644.34,-1079.06 1656.91,-1066.5 1695.64,-1066.5 1695.64,-1121.81 1684.95,-1132.5
Bottom Layer:
  rectangle net NetD2_2: 1297.26,-762.32 1332.43,-697.58
  rectangle net C_AGND: 1329.3,-219.35 1355.36,-140
  rectangle net NetC27_2: 1430.36,-229 1473.31,-140.92
  rectangle net NetC24_2: 1399.46,-305.35 1470.36,-245.35
  rectangle net NetC28_1: 1290.36,108.83 1329.3,168.03
  rectangle net NetC31_1: 1290.36,38.83 1329.3,98.03
  rectangle net NetC32_2: 1290.36,-31.17 1329.3,28.03
  rectangle net NetC29_2: 1290.36,-101.07 1329.3,-41.87
  rectangle net NetF1_2: 1235.98,-1667.07 1354,-1411
  rectangle net ENA: 315.34,-1191.05 345.34,-1133.19
  rectangle net 3.3V: 688.4,-1336.06 768.03,-1298.28
  rectangle net 5V: 969,-1504 1210,-1411
  rectangle net 5V: 1024.16,-1596.83 1210,-1411
  pour cut-out: 293.51,-1335.49 ccw(c415.56,-1335.49) 415.56,-1457.54 ccw(c415.56,-1335.49) 537.61,-1335.49 ccw(c415.56,-1335.49) 415.56,-1213.44 ccw(c415.56,-1335.49)
  pour cut-out: 293.47,-94.82 ccw(c415.51,-94.82) 415.51,-216.87 ccw(c415.51,-94.82) 537.56,-94.82 ccw(c415.51,-94.82) 415.51,27.23 ccw(c415.51,-94.82)
  pour cut-out: 1649.1,-94.82 ccw(c1771.15,-94.82) 1771.15,-216.87 ccw(c1771.15,-94.82) 1893.2,-94.82 ccw(c1771.15,-94.82) 1771.15,27.23 ccw(c1771.15,-94.82)
  pour cut-out: 1649.1,-1335.49 ccw(c1771.15,-1335.49) 1771.15,-1457.54 ccw(c1771.15,-1335.49) 1893.2,-1335.49 ccw(c1771.15,-1335.49) 1771.15,-1213.44 ccw(c1771.15,-1335.49)
  pour cut-out: 1236.43,-640.58 1236.43,-738.58 1338.43,-738.58 1338.43,-691.58 1296.43,-691.58 1296.43,-640.58
  pour cut-out: 1479.8,-131.62 1479.8,-314.13 1391.23,-314.13 1391.23,-229 1423.87,-229 1423.87,-131.62
  pour cut-out: 1015,-1691.09 1147,-1691.09 1147,-1747.99 1016.04,-1747.99 1015,-1749.03
  pour cut-out: 1354,-1667.07 1354,-1696.99 1229.49,-1696.99 1229.49,-1667.07
  pour cut-out: 1210,-1602.23 1210,-1411 1235.98,-1411 1235.98,-1602.23

## Silkscreen, mask and mechanical layers (free items; w line width, h text height)
Top Overlay:
  lines w5: 201.42,-1296.73 188.31,-1283.61 188.31,-1171.11 222.27,-1170.9
  text "MUTE" at 1062.95,396.25 h60 r103
  text "VOL-" at 1160.88,386.65 h60 r78
  text "VOL+" at 1634.33,246.6 h60 r52.9
  text "ON/OFF" at 296.66,-26 h60 r128
  text "+ve" at 2189.54,-183.32 h47.24 r21
  text "-ve" at 2310.04,-515.19 h47.24 r21
  text "CTRL" at 1111.24,-562.28 h47.24 r90
  text "3V3" at 2132.16,-788.41 h47.24 r90
  text "PROGRAM" at 2223.54,-856.07 h60 r90
  text "BUTTON4" at 2136.79,-1205.29 h60 r73
  text "5V" at 1005.35,-1510 h47.24
  text "5V0" at 1005.35,-1650 h47.24
  text "RESET" at 536.91,-1755.84 h55 r335
Bottom Overlay:
  drawing of 3075 lines, arcs and shapes, not listed
  text "ZERO CARBON FOOTPRINT" at 1553.81,-1335.05 h38
  text "USB" at 1285.19,-2068.42 h60 r270
Board Outline:
  circle w10: c415.51,-94.82 r41.34
  circle w10: c1771.15,-1335.49 r41.34
  circle w10: c1771.15,-94.82 r41.34
  circle w10: c415.56,-1335.49 r41.34
  lines w10: -11.73,-1513.44 ccw(c1093.33,-765.28) 912.5,-2087.48 ccw(c1093.33,-765.28) 1264.47,-2088.77 ccw(c1093.33,-765.28) 1959.53,249.91 1911.11,185.85 1785.99,280.46 1832.72,345.69 ccw(c1093.74,-764.47) 1451.54,520.26 1435.83,446.32 1281.77,479.08 1297.6,553.53 ccw(c1093.39,-764.03) 874.02,551.09 891.06,477.23 737.6,441.8 720.47,516.09 ccw(c1092.88,-764.34) 340.47,336.6 388.11,271.32 264.02,174.36 213.9,238.49 ccw(c1092.1,-764.27) 0,-0.01 177.13,-1.08 177.13,-1512.97 -11.73,-1513.44
Fabrication:
  drawing of 191 lines, arcs and shapes, not listed
  text "Layer" at 4347.58,437 h60
  text "Name" at 4757.49,437 h60
  text "Material" at 5687.23,437 h60
  text "Thickness" at 6547,437 h60
  text "Constant" at 7196.84,437 h60
  text "Board Layer Stack" at 7766.7,437 h60
  text "Top Overlay" at 4757.49,317 h60
  text "Top Solder" at 4757.49,197 h60
  text "Solder Resist" at 5687.23,197 h60
  text "0.39mil" at 6547,197 h60
  text "3.5" at 7196.84,197 h60
  text "1" at 4347.58,77 h60
  text "Top Layer" at 4757.49,77 h60
  text "1.38mil" at 6547,77 h60
  text "Dielectric 1" at 4757.49,-43 h60
  text "FR-4" at 5687.23,-43 h60
  text "59.06mil" at 6547,-43 h60
  text "4.8" at 7196.84,-43 h60
  text "2" at 4347.58,-163 h60
  text "Bottom Layer" at 4757.49,-163 h60
  text "1.38mil" at 6547,-163 h60
  text "Bottom Solder" at 4757.49,-283 h60
  text "Solder Resist" at 5687.23,-283 h60
  text "0.39mil" at 6547,-283 h60
  text "3.5" at 7196.84,-283 h60
  text "Bottom Overlay" at 4757.49,-403 h60
  text "Total board thickness:" at 4347.58,-523 h60
  text "62.60mil" at 6547,-523 h60
Drill Drawing:
  circle w10: c180.62,1958.28 r20
  circle w10: c180.62,1958.28 r33.33
  lines w10: 147.29,1174.94 180.62,1191.61 213.96,1174.94 197.29,1208.28 213.96,1241.61 180.62,1224.94 147.29,1241.61 163.96,1208.28 147.29,1174.94 ; 147.29,1391.61 213.96,1391.61 180.62,1324.94 147.29,1391.61 ; 147.29,1508.28 180.62,1474.94 213.96,1508.28 180.62,1541.61 147.29,1508.28 ; 147.29,1624.94 213.96,1624.94 213.96,1691.61 147.29,1691.61 147.29,1624.94 ; 147.29,1791.61 163.96,1791.61 180.62,1774.94 197.29,1791.61 213.96,1791.61 197.29,1808.28 213.96,1824.94 197.29,1824.94 180.62,1841.61 163.96,1824.94 147.29,1824.94 163.96,1808.28 147.29,1791.61 ; 147.29,2141.61 213.96,2141.61 180.62,2074.94 147.29,2141.61 ; 147.29,2241.61 163.96,2241.61 180.62,2224.94 197.29,2241.61 213.96,2241.61 197.29,2258.28 213.96,2274.94 197.29,2274.94 180.62,2291.61 163.96,2274.94 147.29,2274.94 163.96,2258.28 147.29,2241.61 ; 160.62,2128.28 200.62,2128.28 180.62,2088.28 160.62,2128.28 ; 160.62,2248.28 170.62,2248.28 180.62,2238.28 190.62,2248.28 200.62,2248.28 190.62,2258.28 200.62,2268.28 190.62,2268.28 180.62,2278.28 170.62,2268.28 160.62,2268.28 170.62,2258.28 160.62,2248.28
  lines w15: 87.5,1129.94 13505.72,1129.94 ; 87.5,2329.94 13505.72,2329.94 ; 638.38,979.94 638.38,2479.94 ; 1228.22,979.94 1228.22,2479.94 ; 2327.9,979.94 2327.9,2479.94 ; 2833.78,979.94 2833.78,2479.94 ; 3567.58,979.94 3567.58,2479.94 ; 5067.13,979.94 5067.13,2479.94 ; 5656.98,979.94 5656.98,2479.94 ; 6402.78,979.94 6402.78,2479.94 ; 7492.46,979.94 7492.46,2479.94 ; 8346.22,979.94 8346.22,2479.94 ; 9679.83,979.94 9679.83,2479.94 ; 11013.44,979.94 11013.44,2479.94 ; 12103.12,979.94 12103.12,2479.94 ; 87.5,979.94 13505.72,979.94 13505.72,2479.94 87.5,2479.94 87.5,979.94
  text "Symbol" at 177.5,2374.94 h72
  text "Count" at 683.38,2374.94 h72
  text "Hole Size" at 1273.22,2374.94 h72
  text "Plated" at 2372.9,2374.94 h72
  text "Hole Type" at 2878.78,2374.94 h72
  text "Drill Layer Pair" at 3612.58,2374.94 h72
  text "Via/Pad" at 5112.13,2374.94 h72
  text "Pad Shape" at 5701.98,2374.94 h72
  text "Template" at 6447.78,2374.94 h72
  text "Description" at 7537.46,2374.94 h72
  text "Hole Tolerance (+)" at 8391.22,2374.94 h72
  text "Hole Tolerance (-)" at 9724.83,2374.94 h72
  text "Hole Length" at 11058.44,2374.94 h72
  text "Routed Path Length" at 12148.12,2374.94 h72
  text "2" at 683.38,2224.94 h60
  text "0.600mm (23.62mil)" at 1273.22,2224.94 h60
  text "PTH" at 2372.9,2224.94 h60
  text "Slot" at 2878.78,2224.94 h60
  text "Top Layer - Bottom Layer" at 3612.58,2224.94 h60
  text "Pad" at 5112.13,2224.94 h60
  text "Rounded" at 5701.98,2224.94 h60
  text "r90_170h60_140r45" at 6447.78,2224.94 h60
  text "1.400mm (55.12mil)" at 11058.44,2224.94 h60
  text "0.800mm (31.50mil)" at 12148.12,2224.94 h60
  text "2" at 683.38,2074.94 h60
  text "0.600mm (23.62mil)" at 1273.22,2074.94 h60
  text "PTH" at 2372.9,2074.94 h60
  text "Slot" at 2878.78,2074.94 h60
  text "Top Layer - Bottom Layer" at 3612.58,2074.94 h60
  text "Pad" at 5112.13,2074.94 h60
  text "Rounded" at 5701.98,2074.94 h60
  text "(Mixed)" at 6447.78,2074.94 h60
  text "1.700mm (66.93mil)" at 11058.44,2074.94 h60
  text "1.100mm (43.31mil)" at 12148.12,2074.94 h60
  text "2" at 683.38,1924.94 h60
  text "0.620mm (24.41mil)" at 1273.22,1924.94 h60
  text "NPTH" at 2372.9,1924.94 h60
  text "Round" at 2878.78,1924.94 h60
  text "Top Layer - Bottom Layer" at 3612.58,1924.94 h60
  text "Pad" at 5112.13,1924.94 h60
  text "Rounded" at 5701.98,1924.94 h60
  text "c0hn62" at 6447.78,1924.94 h60
  text "-" at 11058.44,1924.94 h60
  text "-" at 12148.12,1924.94 h60
  text "2" at 683.38,1774.94 h60
  text "1.100mm (43.31mil)" at 1273.22,1774.94 h60
  text "PTH" at 2372.9,1774.94 h60
  text "Round" at 2878.78,1774.94 h60
  text "Top Layer - Bottom Layer" at 3612.58,1774.94 h60
  text "Pad" at 5112.13,1774.94 h60
  text "(Mixed)" at 5701.98,1774.94 h60
  text "(Mixed)" at 6447.78,1774.94 h60
  text "-" at 11058.44,1774.94 h60
  text "-" at 12148.12,1774.94 h60
  text "4" at 683.38,1624.94 h60
  text "2.100mm (82.68mil)" at 1273.22,1624.94 h60
  text "NPTH" at 2372.9,1624.94 h60
  text "Round" at 2878.78,1624.94 h60
  text "Top Layer - Bottom Layer" at 3612.58,1624.94 h60
  text "Pad" at 5112.13,1624.94 h60
  text "Rounded" at 5701.98,1624.94 h60
  text "c260hn210m270" at 6447.78,1624.94 h60
  text "-" at 11058.44,1624.94 h60
  text "-" at 12148.12,1624.94 h60
  text "8" at 683.38,1474.94 h60
  text "0.900mm (35.43mil)" at 1273.22,1474.94 h60
  text "PTH" at 2372.9,1474.94 h60
  text "Round" at 2878.78,1474.94 h60
  text "Top Layer - Bottom Layer" at 3612.58,1474.94 h60
  text "Pad" at 5112.13,1474.94 h60
  text "Rounded" at 5701.98,1474.94 h60
  text "c160h90" at 6447.78,1474.94 h60
  text "-" at 11058.44,1474.94 h60
  text "-" at 12148.12,1474.94 h60
  text "8" at 683.38,1324.94 h60
  text "1.000mm (39.37mil)" at 1273.22,1324.94 h60
  text "PTH" at 2372.9,1324.94 h60
  text "Round" at 2878.78,1324.94 h60
  text "Top Layer - Bottom Layer" at 3612.58,1324.94 h60
  text "Pad" at 5112.13,1324.94 h60
  text "Rounded" at 5701.98,1324.94 h60
  text "c180h100" at 6447.78,1324.94 h60
  text "-" at 11058.44,1324.94 h60
  text "-" at 12148.12,1324.94 h60
  text "148" at 683.38,1174.94 h60
  text "0.300mm (11.81mil)" at 1273.22,1174.94 h60
  text "PTH" at 2372.9,1174.94 h60
  text "Round" at 2878.78,1174.94 h60
  text "Top Layer - Bottom Layer" at 3612.58,1174.94 h60
  text "(Mixed)" at 5112.13,1174.94 h60
  text "Rounded" at 5701.98,1174.94 h60
  text "(Mixed)" at 6447.78,1174.94 h60
  text "-" at 11058.44,1174.94 h60
  text "-" at 12148.12,1174.94 h60
  text "176 Total" at 683.38,1024.94 h60
  text "Slot definitions :" at 177.5,879.97 h60
  text "Routed Path Length" at 1210.19,879.97 h60
  text "= Calculated from tool start centre position to tool end centre position." at 2312.86,879.97 h60
  text "Hole Length" at 1210.19,779.99 h60
  text "= Routed Path Length + Tool Size = Slot length as defined in the PCB layout" at 1902.99,779.99 h60

## Text inside footprints (layer, text, board x,y; h text height)
J1: Bottom Overlay "Board Edge" at 1223.48,-2039.59 h28